# Altium PCB Grant..PcbDoc (part 3 of 5)
Units mil, origin at the board's own origin, x right, y up, seen from the top; angles counter-clockwise.
Board outline 2981 x 2481 mil, 2 copper layers (Top Layer, Bottom Layer), stack 57 mil thick; 181 components, 108 nets, 631 pads, 224 vias.
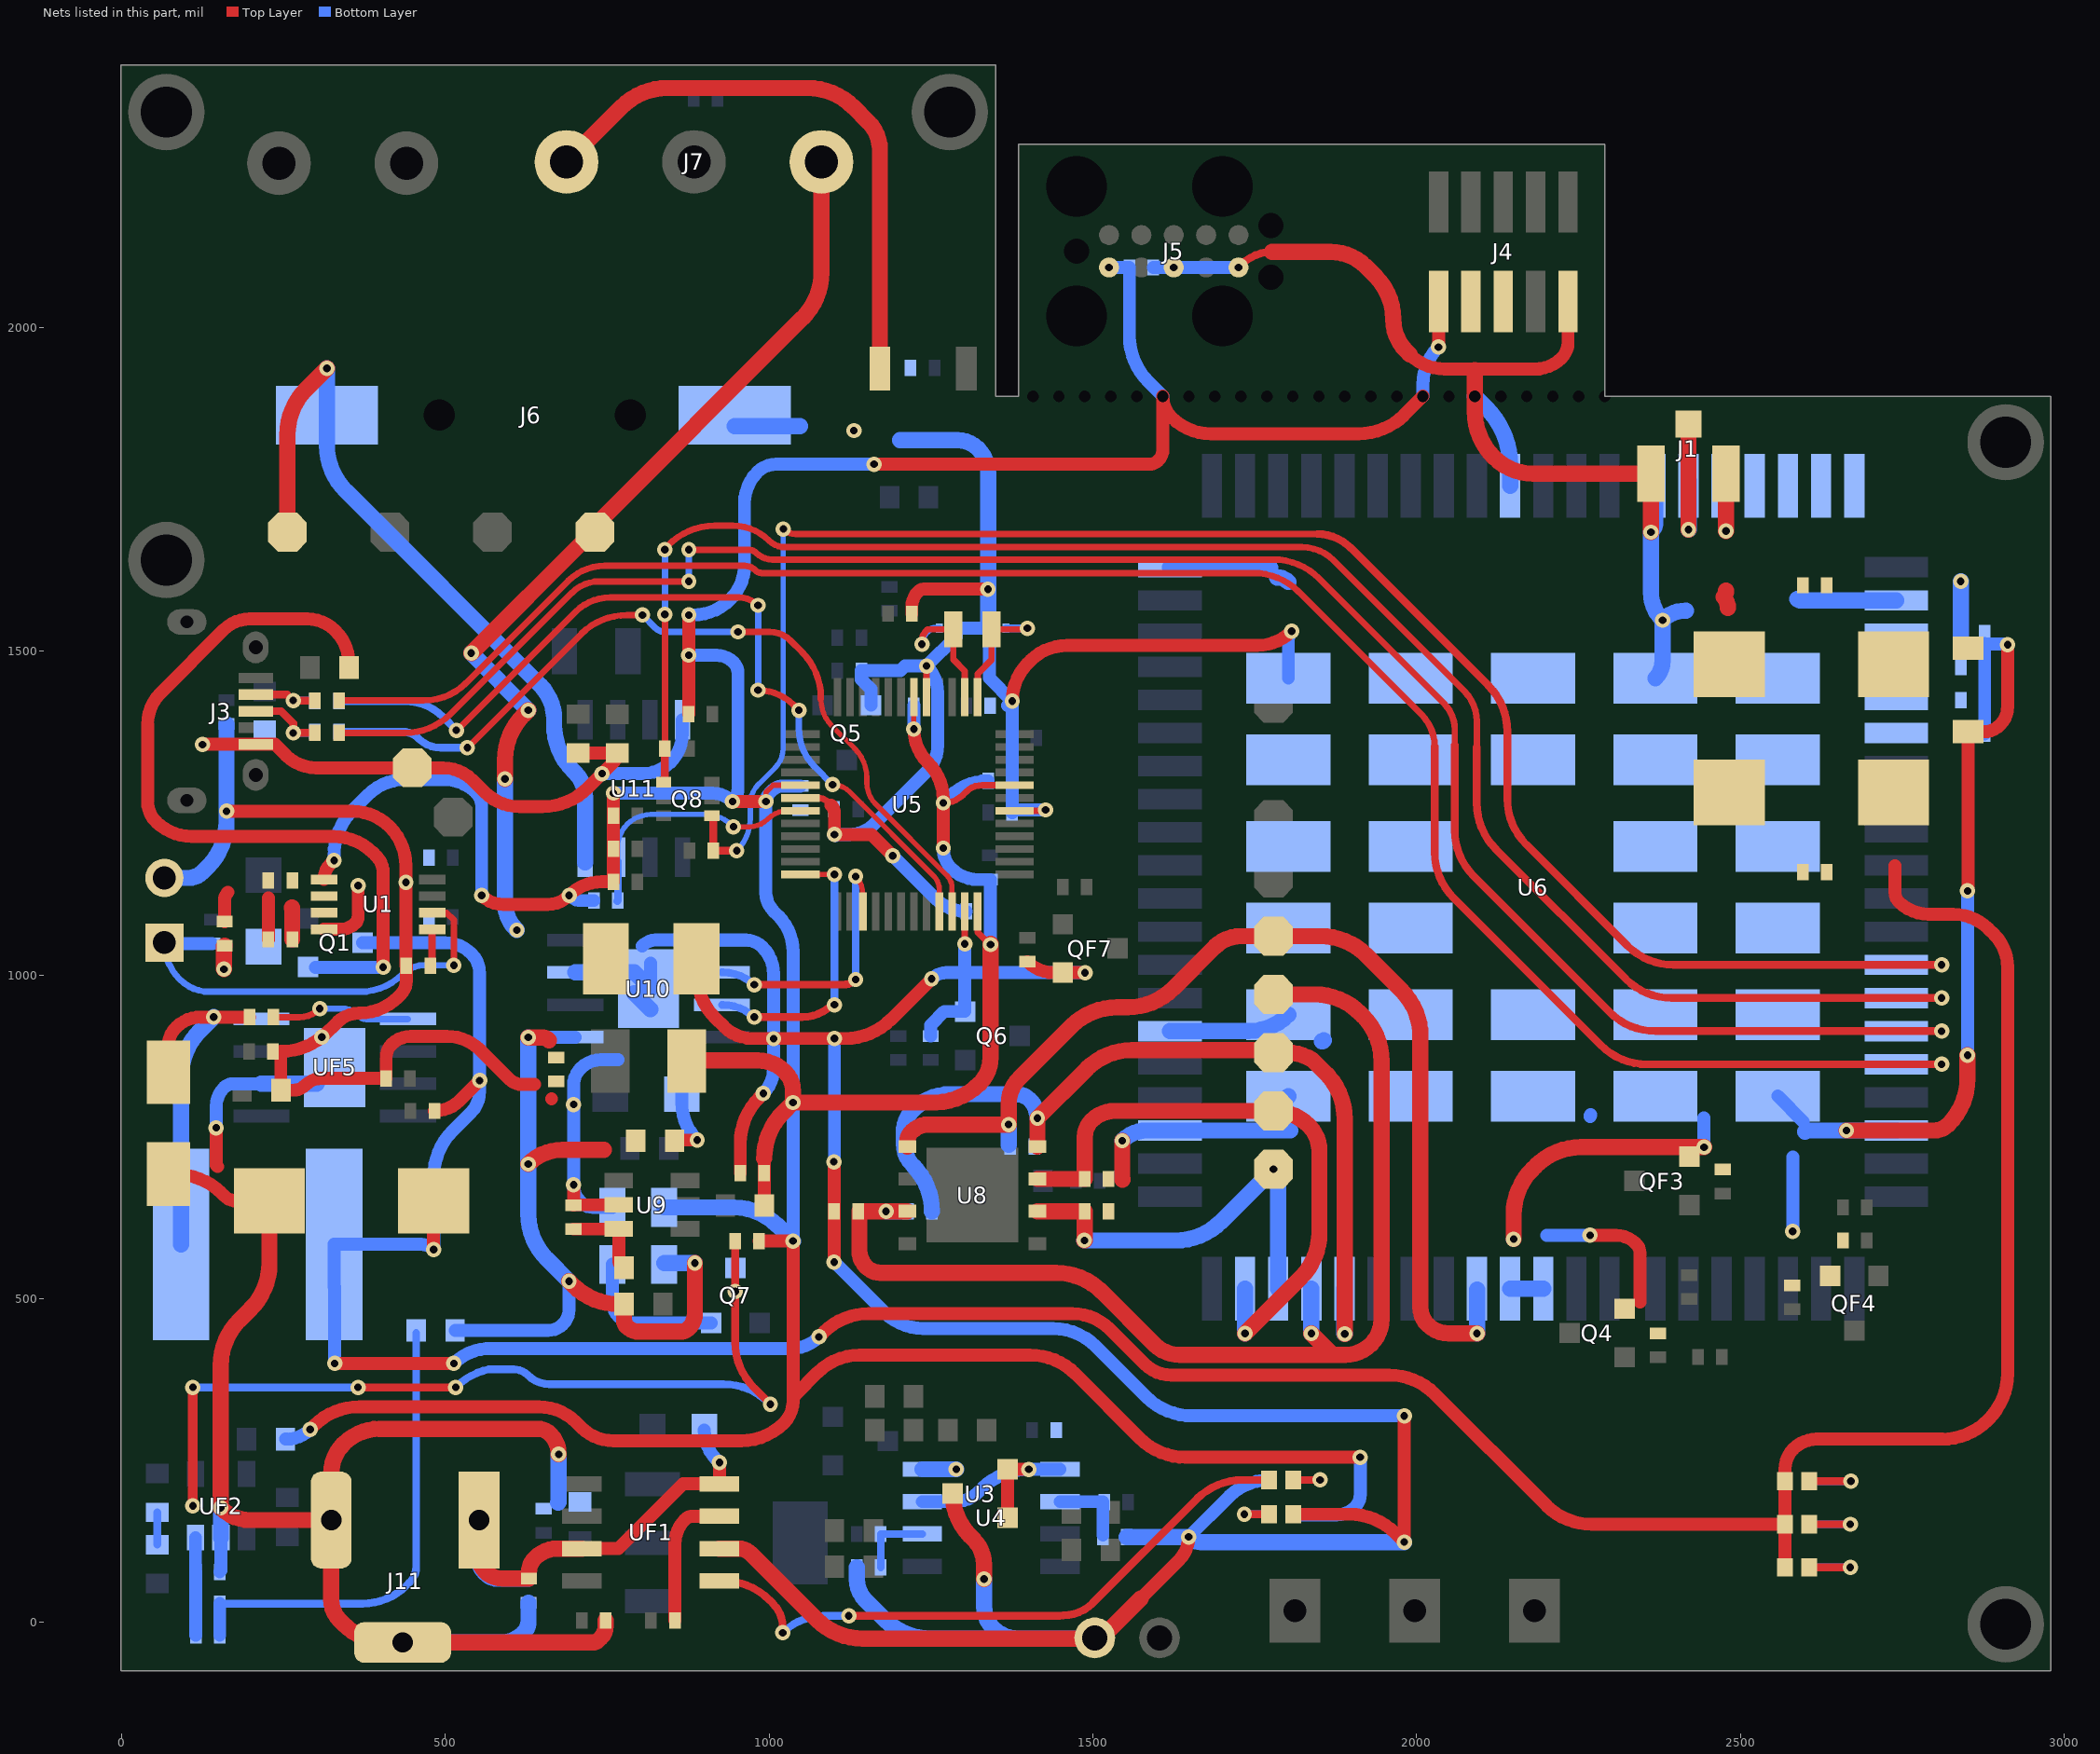
[diagram p2: the nets of this part, all layers, seen from the top]

## Part data (continued)
RP3: library part AC0402FR-0762KL, "RES SMD 62K OHM 1% 1/16W 0402", Case/Package=0402, Manufacturer=Yageo, Max Operating Temperature=155°C, Max Power Dissipation=63mW, Min Operating Temperature=-55°C, Resistance=62kR, Supplier Part Number 1=AC0402FR-0762KL-ND, Temperature Coefficient=100ppm/°C, Tolerance=1%, ComponentLink1Description=http://www.yageo.com/documents/recent/PYu-AC_51_RoHS_L_2_revised.pdf?src-supplier=Future+Electronics, ComponentLink1URL=http://www.yageo.com/documents/recent/PYu-AC_51_RoHS_L_2_revised.pdf?src-supplier=Future+Electronics, ComponentLink2Description=http://www.yageo.com/NewPortal/yageodocoutput?fileName=/pdf/R-Chip/PYu-AC_51_RoHS_L_6.pdf&src-supplier=Digi-Key, ComponentLink2URL=http://www.yageo.com/NewPortal/yageodocoutput?fileName=/pdf/R-Chip/PYu-AC_51_RoHS_L_6.pdf&src-supplier=Digi-Key, Composition="Thick Film", Features="Moisture Resistant,Automotive AEC-Q200", Height=0.015inch, Lead Free="Lead Free", Length=0.039inch, Manufacturer Part Number=AC0402FR-0762KL, Number of Terminations=2, Packaging="Tape and Reel", Power Rating=63mW, Pricing 1="10000=0.0022 (USD)", Stock 1=0, Supplier 1=Digi-Key, Width=0.02inch
RP4: library part RTT024022FTH, "40.2K ±1% 1/16W ±100ppm/°C 0402 Chip Resistor - Surface Mount RoHS", Manufacturer=RALEC, Package=0402, Manufacturer Part No=RTT024022FTH
S1: "SPDT 3A 250V On-On DIP Toggle Switches RoHS", Manufacturer="XKB Enterprise", Package=Custom, Manufacturer Part No=SS-12D06L5
SB1 SB2 SB4 SB5 SB6 SB7 SB8 SB9 SB10 SB11 SB12 SB13 SB14 SB15 SB16 SB17 SB18 SB19 SB20: "Solder Bridge ON"
SW1: "SWITCH TACTILE SPST-NO 0.05A 12V", Contact Current Rating=50mA, Contact Resistance=100mR, Insulation Resistance=100MR, Manufacturer=Omron, Max Operating Temperature=70°C, Max Voltage Rating (DC)=12V, Min Operating Temperature=-25°C, Operating Force=1.5N, Package Quantity=1, Ratings="Dust Proof,IP40", Supplier Part Number 1=SW1020DKR-ND, Actuator Length=0.4mm, Actuator Type=Standard, ComponentLink1Description=http://www.farnell.com/datasheets/60838.pdf?src-supplier=Farnell, ComponentLink1URL=http://www.farnell.com/datasheets/60838.pdf?src-supplier=Farnell, ComponentLink2Description=http://www.farnell.com/datasheets/60838.pdf?src-supplier=Element14, ComponentLink2URL=http://www.farnell.com/datasheets/60838.pdf?src-supplier=Element14, ComponentLink3Description=https://omronfs.omron.com/en_US/ecb/products/pdf/en-b3u.pdf?src-supplier=Digi-Key, ComponentLink3URL=https://omronfs.omron.com/en_US/ecb/products/pdf/en-b3u.pdf?src-supplier=Digi-Key, ComponentLink4Description=http://www.omron.com/ecb/products/pdf/en-b3u.pdf?src-supplier=Digi-Key, ComponentLink4URL=http://www.omron.com/ecb/products/pdf/en-b3u.pdf?src-supplier=Digi-Key, ComponentLink5Description=https://www.distrelec.biz/Web/Downloads/he/et/B3U_eng_datasheet.pdf?mime=application%2Fpdf&src-supplier=Distrelec, ComponentLink5URL=https://www.distrelec.biz/Web/Downloads/he/et/B3U_eng_datasheet.pdf?mime=application%2Fpdf&src-supplier=Distrelec, ComponentLink6Description=http://www.onlinecomponents.com/productFiles/mf-OM/en-b3u.pdf?src-supplier=Onlinecomponents.com, ComponentLink6URL=http://www.onlinecomponents.com/productFiles/mf-OM/en-b3u.pdf?src-supplier=Onlinecomponents.com, ComponentLink7Description=https://www.verical.com/server-webapp/html/getDatasheet?partID=552554&src-supplier=Verical, ComponentLink7URL=https://www.verical.com/server-webapp/html/getDatasheet?partID=552554&src-supplier=Verical, ComponentLink8Description=http://www.farnell.com/datasheets/1685550.pdf?src-supplier=Element14, ComponentLink8URL=http://www.farnell.com/datasheets/1685550.pdf?src-supplier=Element14, ComponentLink9Description=http://www.farnell.com/datasheets/2610940.pdf?src-supplier=Farnell, ComponentLink9URL=http://www.farnell.com/datasheets/2610940.pdf?src-supplier=Farnell, ComponentLink10Description=https://www.alliedelec.com/m/d/4c8a9ef82804fc3c241a13c1e298fd73.pdf?src-supplier=Allied+Electronics, ComponentLink10URL=https://www.alliedelec.com/m/d/4c8a9ef82804fc3c241a13c1e298fd73.pdf?src-supplier=Allied+Electronics, Contact Material=Silver, Current Rating=50mA, Depth=2.5mm, Electrical Life=200000Cycles, Height=1.2mm, Illumination Type=Non-Illuminated,Illuminated, Lead Free="Lead Free", Length=4mm, Manufacturer Part Number=B3U-1000P, Max Current Rating=50mA, Mechanical Life=200000Cycles, Mount="Surface Mount", Orientation=Straight, Packaging="Tape and Reel", Pricing 1="1=1, 10=0.961, 25=0.9064, 50=0.7976, 100=0.7251, 250=0.68888, 500=0.67074, 1000=0.52571 (USD)", REACH SVHC=Unknown, Stock 1=116454, Supplier 1=Digi-Key, Switch Function=Off-Mom, Switch Travel=0.15mm, Termination=SMD/SMT, Throw Configuration=SPST, Voltage Rating (DC)=12V, Weight=0.000776oz, Width=3mm
U1: "IC REG LINEAR 3.3V 500MA MICRO8", Case/Package=MSOP, Dropout Voltage=340mV, Manufacturer="ON Semiconductor", Max Input Voltage=16V, Max Operating Temperature=150°C, Max Output Current=800mA, Min Input Voltage=2.6V, Min Operating Temperature=-40°C, Min Output Voltage=3.3V, Output Voltage Accuracy=0.9%, Package Quantity=4000, Reference Voltage=1.269V, Supplier Part Number 1=NCP3335ADM330R2GOSCT-ND, Accuracy=0.9%, ComponentLink1Description=http://www.onsemi.com/pub_link/Collateral/NCP3335A-D.PDF?src-supplier=Future+Electronics, ComponentLink1URL=http://www.onsemi.com/pub_link/Collateral/NCP3335A-D.PDF?src-supplier=Future+Electronics, ComponentLink2Description=http://www.onsemi.com/pub/Collateral/NCP3335A-D.PDF?src-supplier=Digi-Key, ComponentLink2URL=http://www.onsemi.com/pub/Collateral/NCP3335A-D.PDF?src-supplier=Digi-Key, Halogen Free="Halogen Free", Height=0.95mm, Lead Free="Lead Free", Length=3.1mm, Manufacturer Part Number=NCP3335ADM330R2G, Mount="Surface Mount", Number of Outputs=1, Number of Pins=8, Number of Regulators=1, Output Current=800mA, Output Type=Fixed, Output Voltage=3.3V, Packaging="Tape and Reel", Polarity=Positive, Pricing 1="1=1.12, 10=1.003, 25=0.952, 100=0.731, 250=0.646, 500=0.612, 1000=0.476 (USD)", Radiation Hardening=No, Stock 1=2299, Supplier 1=Digi-Key, Width=3.1mm
U3: "IC VREF SHUNT 18V 0.5% SOT23", Case/Package=SOT-23, Cathode Current=100uA, Manufacturer="Diodes Zetex", Max Input Voltage=20V, Max Operating Temperature=125°C, Max Output Current=15mA, Max Output Voltage=18V, Min Operating Temperature=-40°C, Min Output Voltage=1.24V, Package Quantity=1, Supplier Part Number 1=TLV431BFCT-ND, Tolerance=0.5%, ComponentLink1Description=https://www.diodes.com/assets/Datasheets/TLV431.pdf?src-supplier=Digi-Key, ComponentLink1URL=https://www.diodes.com/assets/Datasheets/TLV431.pdf?src-supplier=Digi-Key, ComponentLink2Description=http://www.farnell.com/datasheets/1904413.pdf?src-supplier=Element14, ComponentLink2URL=http://www.farnell.com/datasheets/1904413.pdf?src-supplier=Element14, ComponentLink3Description=http://www.farnell.com/datasheets/2100168.pdf?src-supplier=Element14, ComponentLink3URL=http://www.farnell.com/datasheets/2100168.pdf?src-supplier=Element14, ComponentLink4Description=http://www.diodes.com/datasheets/TLV431.pdf?src-supplier=Future+Electronics, ComponentLink4URL=http://www.diodes.com/datasheets/TLV431.pdf?src-supplier=Future+Electronics, Height=1.02mm, Lead Free="Lead Free", Length=3.04mm, Manufacturer Part Number=TLV431BFTA, Mount="Surface Mount", Number of Pins=3, Output Current=15mA, Output Type=Adjustable, Output Voltage=18V, Packaging="Tape and Reel", Pricing 1="1=0.49, 10=0.417, 25=0.3888, 100=0.2889, 250=0.24444, 500=0.23332, 1000=0.17221 (USD)", Radiation Hardening=No, REACH SVHC="No SVHC", Reference Type=Shunt,Adjustable, Reference Voltage=18V, Stock 1=51651, Supplier 1=Digi-Key, Width=1.4mm
U4: "IC COMPARATOR LP DUAL 8-SOIC", Case/Package=SO, Dual Supply Voltage=9V, Input Bias Current=250nA, Input Offset Voltage (Vos)=5mV, Manufacturer=STMicroelectronics, Max Dual Supply Voltage=18V, Max Operating Temperature=70°C, Max Power Dissipation=710mW, Max Supply Current=1mA, Max Supply Voltage=36V, Min Dual Supply Voltage=1V, Min Operating Temperature=0°C, Min Supply Voltage=2V, Natural Thermal Resistance=125°C/W, Operating Supply Voltage=28V, Output Current=18mA, Output Current per Channel=100pA, Package Quantity=2500, Quiescent Current=2.5mA, Supplier Part Number 1=497-1593-1-ND, Voltage Gain=106.02dB, ComponentLink1Description=http://www.st.com/content/ccc/resource/technical/document/datasheet/group1/b4/cc/cf/13/18/28/44/f5/CD00000465/files/CD00000465.pdf/jcr:content/translations/en.CD00000465.pdf?src-supplier=Digi-Key, ComponentLink1URL=http://www.st.com/content/ccc/resource/technical/document/datasheet/group1/b4/cc/cf/13/18/28/44/f5/CD00000465/files/CD00000465.pdf/jcr:content/translations/en.CD00000465.pdf?src-supplier=Digi-Key, ComponentLink2Description=https://www.verical.com/server-webapp/html/getDatasheet?partID=302604&src-supplier=Verical, ComponentLink2URL=https://www.verical.com/server-webapp/html/getDatasheet?partID=302604&src-supplier=Verical, ComponentLink3Description=http://www.st.com/st-web-ui/static/active/en/resource/technical/document/datasheet/CD00000465.pdf?src-supplier=Avnet, ComponentLink3URL=http://www.st.com/st-web-ui/static/active/en/resource/technical/document/datasheet/CD00000465.pdf?src-supplier=Avnet, ComponentLink4Description=http://www.mouser.com/ds/2/389/lm193-955038.pdf?src-supplier=Mouser, ComponentLink4URL=http://www.mouser.com/ds/2/389/lm193-955038.pdf?src-supplier=Mouser, ComponentLink5Description=http://www.farnell.com/datasheets/2291162.pdf?src-supplier=Element14, ComponentLink5URL=http://www.farnell.com/datasheets/2291162.pdf?src-supplier=Element14, ComponentLink6Description=https://www.distrelec.biz/Web/Downloads/_e/ng/LM393_ST_tds_eng.pdf?mime=application%2Fpdf&src-supplier=Distrelec, ComponentLink6URL=https://www.distrelec.biz/Web/Downloads/_e/ng/LM393_ST_tds_eng.pdf?mime=application%2Fpdf&src-supplier=Distrelec, ComponentLink7Description=http://www.st.com/web/en/resource/technical/document/datasheet/CD00000465.pdf?src-supplier=Future+Electronics, ComponentLink7URL=http://www.st.com/web/en/resource/technical/document/datasheet/CD00000465.pdf?src-supplier=Future+Electronics, ComponentLink8Description=http://datasheet.iiic.cc/stmicroelectronics/LM393DT.pdf?src-supplier=IIIC, ComponentLink8URL=http://datasheet.iiic.cc/stmicroelectronics/LM393DT.pdf?src-supplier=IIIC, Contact Plating=Gold, Height=1.25mm, Lead Free="Lead Free", Length=4.9mm, Manufacturer Part Number=LM393DT, Max Input Current=250nA, Mount="Surface Mount", Nominal Supply Current=1mA, Number of Channels=2, Number of Elements=2, Number of Pins=8, Output Type=TTL, Packaging="Tape and Reel", Pricing 1="1=0.48, 10=0.358, 25=0.3136, 100=0.1792, 250=0.168, 500=0.1344, 1000=0.10304 (USD)", Propagation Delay=1.3us, Radiation Hardening=No, REACH SVHC="No SVHC", Response Time=1.3us, Stock 1=46251, Supplier 1=Digi-Key, Turn-On Delay Time=1.3us, Type="General Purpose", Weight=0.01lb, Width=3.9mm
U5: "IC MCU 32BIT 256KB FLASH 48TQFP", Manufacturer=Microchip, Manufacturer Part Number=ATSAMD21G18A-AUT, Supplier Part Number 1=ATSAMD21G18A-AUTDKR-ND, ComponentLink1Description=http://www.microchip.com/mymicrochip/filehandler.aspx?ddocname=en590210, ComponentLink1URL=http://www.microchip.com/mymicrochip/filehandler.aspx?ddocname=en590210, Pricing 1="1=3.32, 25=3.0104, 100=2.7348 (USD)", Stock 1=4547, Supplier 1=Digi-Key
U6: "UMTS/HSPA+ Module", Manufacturer=Quectel, Package=Custom, Manufacturer Part No=UC200T
U8: "GLOBAL IOT EMBEDDED SIM CHIP", Manufacturer=Hologram, Supplier Part Number 1=1887-1002-1-ND, ComponentLink1Description=https://media.digikey.com/pdf/Data%20Sheets/Hologram%20PDFs/SIM_DS_170107_v2.pdf?src-supplier=Digi-Key, ComponentLink1URL=https://media.digikey.com/pdf/Data%20Sheets/Hologram%20PDFs/SIM_DS_170107_v2.pdf?src-supplier=Digi-Key, Manufacturer Part Number=SIM-ST-MFF2, Pricing 1="1=6.3, 100=5.985 (USD)", Stock 1=0, Supplier 1=Digi-Key
U9: "Step-Up Positive Adjustable 1 2A 1.2MHz SOT-23-6 DC-DC Converters RoHS", Manufacturer="Axelite Tech", Package=SOT-23-6, Manufacturer Part No=AX5523CA
U10: "IC MOTOR DRVR UNIPLR 8SO PWRPAD", Manufacturer="Texas Instruments", Max Operating Temperature=125°C, Max Output Current=3.6A, Min Operating Temperature=-40°C, Supplier Part Number 1=296-43024-1-ND, ComponentLink1Description=http://www.ti.com/lit/pdf/slyb165?src-supplier=Digi-Key, ComponentLink1URL=http://www.ti.com/lit/pdf/slyb165?src-supplier=Digi-Key, ComponentLink2Description=http://www.ti.com/lit/ds/symlink/drv8871.pdf?src-supplier=Digi-Key, ComponentLink2URL=http://www.ti.com/lit/ds/symlink/drv8871.pdf?src-supplier=Digi-Key, Fault Protection="Over Temperature", Interface=PWM, Lead Free="Lead Free", Manufacturer Part Number=DRV8871DDAR, Mount="Surface Mount", Packaging="Tape and Reel", Pricing 1="1=2.51, 10=2.253, 25=2.1252, 100=1.7, 250=1.48752, 500=1.445, 1000=1.1475 (USD)", Stock 1=8562, Supplier 1=Digi-Key
U11: "IC RTC CLK/CALENDAR I2C 8-SOIC", Case/Package=SOIC, Manufacturer=Microchip, Max Operating Temperature=85°C, Max Supply Voltage=5.5V, Min Operating Temperature=-40°C, Min Supply Voltage=1.8V, Package Quantity=3300, Supplier Part Number 1=MCP7940MT-I/SNCT-ND, ComponentLink1Description=http://ww1.microchip.com/downloads/en/DeviceDoc/25010A.pdf?src-supplier=Avnet, ComponentLink1URL=http://ww1.microchip.com/downloads/en/DeviceDoc/25010A.pdf?src-supplier=Avnet, Date Format=YY-MM-DD-dd, Interface=I2C,Serial,2-Wire, Logic Function=Clock, Manufacturer Part Number=MCP7940MT-I/SN, Memory Size=64B, Mount="Surface Mount", Number of Pins=8, Packaging="Tape and Reel", Pricing 1="1=0.58, 25=0.54, 100=0.5125 (USD)", Radiation Hardening=No, Stock 1=2867, Supplier 1=Digi-Key, Time Format=HH:MM:SS
UF1: "IC LI-ION LDO CHARGE MGMT 8SOIC", Battery Pack Voltage=8.4V, Case/Package=D, Manufacturer="Texas Instruments", Max Operating Temperature=70°C, Max Supply Voltage=15V, Min Input Voltage=4.5V, Min Operating Temperature=-20°C, Output Current=2A, Package Quantity=2500, Supplier Part Number 1=296-41202-1-ND, ComponentLink1Description=http://www.ti.com/lit/ds/symlink/bq2057c.pdf?src-supplier=Digi-Key, ComponentLink1URL=http://www.ti.com/lit/ds/symlink/bq2057c.pdf?src-supplier=Digi-Key, ComponentLink2Description=http://focus.ti.com/lit/ds/symlink/bq2057.pdf?src-supplier=Avnet+Europe, ComponentLink2URL=http://focus.ti.com/lit/ds/symlink/bq2057.pdf?src-supplier=Avnet+Europe, ComponentLink3Description=http://www.ti.com/general/docs/lit/getliterature.tsp?genericPartNumber=BQ2057W&&fileType=pdf&src-supplier=Avnet, ComponentLink3URL=http://www.ti.com/general/docs/lit/getliterature.tsp?genericPartNumber=BQ2057W&&fileType=pdf&src-supplier=Avnet, ComponentLink4Description=https://www.verical.com/server-webapp/html/getDatasheet?partID=613088&src-supplier=Verical, ComponentLink4URL=https://www.verical.com/server-webapp/html/getDatasheet?partID=613088&src-supplier=Verical, ComponentLink5Description=http://datasheet.iiic.cc/texas_instruments/BQ2057WSNTR.pdf?src-supplier=IIIC, ComponentLink5URL=http://datasheet.iiic.cc/texas_instruments/BQ2057WSNTR.pdf?src-supplier=IIIC, Contact Plating=Gold, Lead Free="Lead Free", Manufacturer Part Number=BQ2057WSNTR, Min Supply Voltage=4.5V, Number of Cells=2, Number of Pins=8, Output Voltage=8.4V, Packaging="Tape and Reel", Pricing 1="1=2.01, 10=1.802, 25=1.7, 100=1.36, 250=1.19, 500=1.156, 1000=0.918 (USD)", Radiation Hardening=No, Stock 1=9023, Supplier 1=Digi-Key, Weight=0.002677oz
UF2: "IC REG BOOST ADJ 2A SOT23-5", Case/Package=SOT-23-5, Manufacturer="TI National Semiconductor", Max Input Voltage=14V, Max Operating Temperature=125°C, Max Output Current=1.4A, Max Output Voltage=20V, Min Input Voltage=2.7V, Min Operating Temperature=-40°C, Min Output Voltage=3V, Package Quantity=1000, Quiescent Current=2mA, Supplier Part Number 1=LMR62014XMF/NOPBCT-ND, Switching Frequency=1.6MHz, ComponentLink1Description=http://www.ti.com/general/docs/lit/getliterature.tsp?genericPartNumber=LMR62014&&fileType=pdf&src-supplier=Avnet, ComponentLink1URL=http://www.ti.com/general/docs/lit/getliterature.tsp?genericPartNumber=LMR62014&&fileType=pdf&src-supplier=Avnet, ComponentLink2Description=http://www.ti.com/lit/gpn/lmr62014?src-supplier=Mouser, ComponentLink2URL=http://www.ti.com/lit/gpn/lmr62014?src-supplier=Mouser, ComponentLink3Description=http://www.farnell.com/datasheets/1882593.pdf?src-supplier=Element14, ComponentLink3URL=http://www.farnell.com/datasheets/1882593.pdf?src-supplier=Element14, ComponentLink4Description=http://www.ti.com/lit/ds/symlink/lmr62014.pdf?src-supplier=Digi-Key, ComponentLink4URL=http://www.ti.com/lit/ds/symlink/lmr62014.pdf?src-supplier=Digi-Key, Contact Plating=Tin,Matte, Lead Free="Lead Free", Manufacturer Part Number=LMR62014XMF/NOPB, Mount="Surface Mount", Number of Outputs=1, Number of Pins=5, Output Configuration=Positive, Output Current=1.4A, Output Type=Adjustable, Output Voltage=20V, Packaging="Tape and Reel", Pricing 1="1=1.6, 10=1.428, 25=1.3552, 100=1.0406, 250=0.9196, 500=0.8712 (USD)", Radiation Hardening=No, REACH SVHC="No SVHC", Stock 1=74950, Supplier 1=Digi-Key, Synchronous Rectifier=No, Topology=Boost
UF5: "IC REG BUCK ADJUSTABLE 3A 8SOPWR", Manufacturer="Texas Instruments", Max Input Voltage=36V, Max Operating Temperature=125°C, Max Output Current=3A, Max Output Voltage=31V, Min Input Voltage=5.5V, Min Operating Temperature=-40°C, Min Output Voltage=1.22V, Package Quantity=2500, Quiescent Current=3mA, Supplier Part Number 1=296-23177-1-ND, Switching Frequency=500kHz, ComponentLink1Description=http://www.ti.com/general/docs/lit/getliterature.tsp?genericPartNumber=TPS5430-Q1&&fileType=pdf&src-supplier=Avnet, ComponentLink1URL=http://www.ti.com/general/docs/lit/getliterature.tsp?genericPartNumber=TPS5430-Q1&&fileType=pdf&src-supplier=Avnet, ComponentLink2Description=http://focus.ti.com/lit/ds/symlink/tps5430-q1.pdf?src-supplier=Avnet+Europe, ComponentLink2URL=http://focus.ti.com/lit/ds/symlink/tps5430-q1.pdf?src-supplier=Avnet+Europe, ComponentLink3Description=http://www.ti.com/lit/ds/symlink/tps5430-q1.pdf?src-supplier=Digi-Key, ComponentLink3URL=http://www.ti.com/lit/ds/symlink/tps5430-q1.pdf?src-supplier=Digi-Key, ComponentLink4Description=http://www.farnell.com/datasheets/2019094.pdf?src-supplier=Element14, ComponentLink4URL=http://www.farnell.com/datasheets/2019094.pdf?src-supplier=Element14, ComponentLink5Description=http://www.ti.com/lit/gpn/tps5430-q1?src-supplier=Mouser, ComponentLink5URL=http://www.ti.com/lit/gpn/tps5430-q1?src-supplier=Mouser, ComponentLink6Description=http://datasheet.iiic.cc/texas_instruments/TPS5430QDDARQ1.pdf?src-supplier=IIIC, ComponentLink6URL=http://datasheet.iiic.cc/texas_instruments/TPS5430QDDARQ1.pdf?src-supplier=IIIC, Efficiency=95%, Lead Free="Lead Free", Manufacturer Part Number=TPS5430QDDARQ1, Mount="Surface Mount", Number of Outputs=1, Number of Pins=8, Operating Supply Voltage=36V, Output Current=3A, Output Type=Adjustable, Output Voltage=31V, Packaging="Tape and Reel", Pricing 1="1=4.81, 10=4.32, 25=4.0836, 100=3.3578, 250=3.01292, 500=2.904, 1000=2.41395 (USD)", Radiation Hardening=No, REACH SVHC="No SVHC", Stock 1=2547, Supplier 1=Digi-Key, Synchronous Rectifier=No, Weight=0.00249oz
X1: "32.768KHz ±20ppm 9pF 90kO SMD-2012_2P SMD Crystal Resonators RoHS", Manufacturer=Seiko, Manufacturer Part No=SC-20S,32.768kHz,20PPM,9pF, Pakage=Custom
X3: "CRYSTAL 32.7680KHZ 12.5PF SMD", Case/Package=SMD/SMT, ESR (Equivalent Series Resistance)=70kR, Frequency=32.768kHz, Frequency Tolerance=20ppm, Load Capacitance=12.5pF, Manufacturer=NDK, Max Operating Temperature=85°C, Min Operating Temperature=-40°C, Package Quantity=1000, Supplier Part Number 1=644-1156-6-ND, ComponentLink1Description=https://media.digikey.com/pdf/Data%20Sheets/NDK%20PDFs/NX3215SA-32.768K-STD-MUA-8.pdf?src-supplier=Digi-Key, ComponentLink1URL=https://media.digikey.com/pdf/Data%20Sheets/NDK%20PDFs/NX3215SA-32.768K-STD-MUA-8.pdf?src-supplier=Digi-Key, ComponentLink2Description=http://www.ndk.com/images/products/catalog/c_NX3215SA-STD-MUA-14_e.pdf?src-supplier=Digi-Key, ComponentLink2URL=http://www.ndk.com/images/products/catalog/c_NX3215SA-STD-MUA-14_e.pdf?src-supplier=Digi-Key, Height=0.035inch, Lead Free="Lead Free", Length=0.126inch, Manufacturer Part Number=NX3215SA-32.768K-STD-MUA-8, Mount="Surface Mount", Number of Pins=2, Packaging="Tape and Reel", Pricing 1="1=0.68, 10=0.602, 50=0.5628, 100=0.4974, 500=0.47124, 1000=0.3927 (USD)", Stock 1=29951, Supplier 1=Digi-Key, Width=0.059inch

## Free pads (board coordinates)
  round 118.11 hole 78.74: MH1(69,1641) MH2(69,2333) MH3(1279,2333) MH4(2910,1823) MH5(2910,-3)
  round 0 hole 17.72 mask+0: NC(1407.37,1894) NC(1608.16,1894) NC(1768.79,1894) NC(1849.1,1894) NC(2009.73,1894) NC(2090.05,1894)
  round 0 hole 17.72 unplated mask+0: NC(1447.53,1894) NC(1487.68,1894) NC(1527.84,1894) NC(1568,1894) NC(1648.32,1894) NC(1688.47,1894) NC(1728.63,1894) NC(1808.94,1894) NC(1889.26,1894) NC(1929.42,1894) NC(1969.57,1894) NC(2049.89,1894) NC(2130.2,1894) NC(2170.36,1894) NC(2210.52,1894) NC(2250.68,1894) NC(2290.83,1894)

## Via types
v1: diameter 23.62, hole 11.81, Top Layer to Bottom Layer, 224 vias

## Nets (pads, with @x,y where several pads share a name; then routed paths per layer and width w, separated by ;. In a path a pad name is that pad's centre, name@x,y a point inside that pad or via, vN(x,y) a via of type N, cw(c..) or ccw(c..) an arc to the next point about the centre after c; other vN are vias at no path point)
3V3: C3.1 C4.1 C11.1 C12.1 C13.1 C14.1 C29.1 C36.1 C40.1 J4.1 J5.1 L1.1 pad.NC@1608.16,1894 pad.NC@2009.73,1894 R1.2 R9.2 R23.2 R24.2 R25.2 RB1.2 RS2.1 RS4.1 SB5.1 SB6.1 U1.1 U1.2 U1.3 U5.6 U5.17 U5.36 U5.44 | length 8433.2
  Top Layer w8: v1(995,1268) 995,1282 1006.17,1293.17 U5.17@1048.38,1293.17 ; v1(1223.57,1380) U5.6@1223.57,1429
  Top Layer w10: v1(1269,1265.81) ccw(c1269,1309.6) 1299.94,1278.62 ; 1299.96,1278.64 1304.2,1282.88 cw(c1329.06,1258.02) 1329.06,1293.17 U5.44@1379.09,1293.17 ; U5.36@1322,1098.29 1322,1066 1340,1048 v1@1342,1048
  Top Layer w20: v1(291,298) 296.71,303.71 cw(c367.42,233) 367.42,333 644,333 cw(c644,250.92) 702.04,308.96 710,301 ccw(c759.68,350.68) 759.68,280.42 956.42,280.42 ccw(c956.42,374.58) 1023,308 ccw(c989.2,341.8) 1037,341.8 ; U1.1@312.54,1147.39 cw(c346.43,1147.39) 322.46,1171.36 v1(328,1176.89) ; v1(556,1123) ccw(c589.8,1156.8) 589.8,1109 657.36,1109 ccw(c657.36,1156.8) v1(691.16,1123) cw(c741.86,1072.3) 741.86,1144 R24.2@759.5,1144 R23.2@759.5,1194.75 RS2.1@759.5,1246 v1(759.5,1281) ; RS4.1@876,1403.5 v1(876,1556) ; v1(943.46,1268) v1@992,1268 ; RB1.2@984.5,589 v1(1037,589) 1037,341.8 ; SB5.1@992.5,644 C36.1@992.5,694 992.5,717.08 ; v1(1162,1789) 1587.18,1789 ccw(c1587.18,1808.65) 1601.08,1794.76 ccw(c1583.98,1811.85) 1606.92,1804.21 ccw(c1583.98,1811.85) 1608.16,1811.85 pad.NC@1608.16,1894 ccw(c1654.41,1894) 1621.7,1861.3 ccw(c1682.77,1922.37) 1682.77,1836 1910.31,1836 ccw(c1910.31,1936) 1981.02,1865.29 pad.NC@2009.73,1894 ; v1(1223.57,1380) ccw(c1296.23,1380) 1244.82,1328.66 ; 1244.85,1328.63 1245.72,1327.76 cw(c1189.51,1271.55) 1269,1271.55 v1(1269,1265.81) v1@1269,1196.81 ; v1(1913,255) 1643.42,255 cw(c1643.42,355) 1572.71,284.29 1473.29,383.71 ccw(c1402.58,313) 1402.58,413 1140.18,413 ccw(c1140.18,320.82) 1075,386 1041.38,352.38 ccw(c1051.97,341.8) 1037,341.8 ; v1(2033.81,1970) 2034,1970.19 J4.1@2034,2040.46
  Top Layer w25: 263,1104 cw(c261.79,1102.79) 263.5,1102.79 C3.1@263.5,1055 ; L1.1@873,868 982.21,868 cw(c982.21,808.04) 1024.61,850.44 cw(c994.68,820.52) 1037,820.52 v1(1037,803) ; 992.5,717.08 cw(c1092.5,717.08) 1021.79,787.79 v1(1037,803) ; v1@1342,1048 v1(1342,1047) 1342,872.63 cw(c1284.95,872.63) 1325.29,832.29 cw(c1254.58,903) 1258.06,803.06 cw(c1254.58,903) 1254.58,803 v1(1037,803)
  Bottom Layer w20: SB6.1@253,283 254.79,283 ccw(c254.79,334.21) v1(291,298) ; v1(328,1176.89) 328,1184.58 cw(c428,1184.58) 357.29,1255.29 380,1278 cw(c437.94,1220.06) 437.94,1302 497.3,1302 cw(c497.3,1230.3) 548,1281 cw(c528.69,1261.69) 556,1261.69 v1(556,1123) ; v1(691.16,1123) ccw(c710.48,1142.31) 710.48,1115 R25.2@729.5,1115 ; v1(759.5,1281) 912.07,1281 cw(c912.07,1236.62) v1(943.46,1268) ccw(c922.83,1288.62) 952,1288.62 952,1466.1 ccw(c928.1,1466.1) 945,1483 ccw(c918.44,1456.44) 918.44,1494 v1(875.81,1494) ; v1(876,1556) 882.06,1556 ccw(c882.06,1637.94) 940,1580 ccw(c886.89,1633.11) 962,1633.11 962,1728.72 cw(c1030.28,1728.72) 982,1777 cw(c1010.97,1748.03) 1010.97,1789 v1(1162,1789) ; v1(1037,589) v1@1037,802 ; v1(1037,803) 1037,1036 ccw(c957.95,1036) 1013.85,1091.9 1006.61,1099.14 cw(c1035,1127.32) 995,1127.32 v1(995,1268) cw(c1011.9,1268) 999.94,1279.94 1005,1285 cw(c1021.87,1268.13) 1021.87,1291.99 C12.1@1048.38,1291.99 ; C11.1@1223.5,1416 1223.5,1380.07 v1(1223.57,1380) ; v1(1269,1196) 1269,1194.68 ccw(c1311.68,1194.68) 1281.5,1164.5 ; v1(1269,1265.81) 1278.22,1275.03 cw(c1338.5,1214.75) 1285.61,1281.61 cw(c1338.5,1214.75) C13.1@1338.5,1300 ; 1281.53,1164.47 ccw(c1322.54,1205.54) 1322.54,1147.5 R9.2@1341,1147.5 1341.5,1147 C14.1@1341.5,1098.29 1341.5,1048.5 v1@1342,1048 ; v1(1525,2093) C29.1@1556.62,2093 1556.62,1986.96 ccw(c1656.62,1986.96) 1585.91,1916.25 pad.NC@1608.16,1894 ; R1.2@1808.5,166 1876.03,166 ccw(c1876.03,206.97) 1905,178 ccw(c1885.69,197.31) 1913,197.31 v1(1913,255) ; pad.NC@2009.73,1894 2009.73,1911.87 cw(c2091.94,1911.87) v1(2033.81,1970)
  Bottom Layer w25: C40.1@838,641 945.58,641 cw(c945.58,545.83) 1012.88,613.12 v1(1037,589)
3V8: C19.1 C20.1 C21.1 C22.1 C23.1 C24.1 C25.1 C26.1 CF3.1 D2.2 L2.2 LED3.1 LED4.1 LEDF1.1 Q1.3 RF5.1 U6.57 U6.58 U6.59 U6.60 | length 5119.8
  Top Layer w20: v1(329,400) v1(513,400) ; CF3.1@481.77,651 481.77,576.12 v1(482,575.89) ; RF5.1@483,790 ccw(c483,845.53) 522.26,806.26 v1(553,837) ; v1(1077,441) 1083.71,447.71 cw(c1154.42,377) 1154.42,477 1467.82,477 cw(c1467.82,394.47) 1526.17,452.83 1579.71,399.29 ccw(c1621.45,441.03) 1621.45,382 1957.58,382 cw(c1957.58,282) 2028.29,352.71 2200.21,180.79 ccw(c2270.92,251.5) 2270.92,151.5 LED4.1@2569.3,151.5 ; LED3.1@2569.3,85 LED4.1@2569.3,151.5 ; 2739,1169 2739,1127.49 ccw(c2759.49,1127.49) 2745,1113 ccw(c2790.87,1158.87) 2790.87,1094 2828.18,1094 cw(c2828.18,1015.47) 2883.71,1071 2891.99,1062.72 cw(c2841.27,1012) 2913,1012 2913,384.42 cw(c2813,384.42) 2883.71,313.71 2882.29,312.29 cw(c2811.58,383) 2811.58,283 2618.21,283 ccw(c2618.21,231.79) 2582,268 ccw(c2612.66,237.34) 2572.63,254 ccw(c2612.66,237.34) 2569.3,237.34 LEDF1.1@2569.3,218 LED4.1@2569.3,151.5
  Bottom Layer w20: v1(329,400) 329,517.89 328,518.89 328.11,519 L2.2@328.11,584 462.43,584 cw(c462.43,556.33) v1(482,575.89) 482,688.58 cw(c582,688.58) 511.29,759.29 539,787 ccw(c505.2,820.8) 553,820.8 v1(553,837) 553,1002.15 ccw(c509.36,1002.15) 540.22,1033.01 ccw(c499.22,992.01) 540.15,1033.08 ccw(c499.22,992.01) 499.22,1049.99 Q1.3@372.32,1049.99 ; v1(513,400) cw(c568.53,344.47) 563.86,422.86 cw(c568.53,344.47) 568.53,423 1033.54,423 ccw(c1033.54,484.46) v1(1077,441)
  Bottom Layer w25: 2840.5,1511.25 C21.1@2840.5,1528.25 v1(2840.5,1608)
12V: C37.1 C38.2 C39.1 J7.1 P16.1 SB11.2 SB12.2 SB13.2 U10.5 | length 2693
  Top Layer w25: v1(540,1497.15) P16.1@716.86,1674.01 ; v1(592,1303) 592,1331.58 cw(c692,1331.58) 621.29,1402.29 v1(628,1409) ; v1(628,708) cw(c681.11,654.89) 681.11,730 745,730 ; v1(628,903.66) 648.7,903.66 cw(c648.7,887.62) 660.04,898.96 ; v1(691,527) 697.21,520.79 ccw(c767.92,591.5) 767.92,491.5 SB13.2@776,491.5 776,466.66 ccw(c789.66,466.66) 780,457 ccw(c799.31,476.31) 799.31,449 863.14,449 ccw(c863.14,467.12) 875.96,454.31 ccw(c853.43,476.84) 885.29,476.84 v1(885.29,555) ; P16.1@721,1684 1051.56,2014.56 ccw(c980.85,2085.27) 1080.85,2085.27 J7.1@1080.85,2256
  Bottom Layer w20: SB12.2@515,451 657.86,451 ccw(c657.86,485.14) 682,461 ccw(c660.27,482.73) 691,482.73 v1(691,527) ; v1(628,903.66) 628.34,904 U10.5@700.62,904
  Bottom Layer w25: v1@539.92,1497.08 v1(628,1409) ; v1@591.79,1302.79 592,1302.57 592,1112.81 ccw(c652.54,1112.81) 609.73,1070 cw(c604.21,1064.47) v1(610.35,1069.31) ; v1(628,903.66) v1(628,708) 628,631.42 ccw(c728,631.42) 657.29,560.71 v1(691,527) ; C37.1@838,555 v1(885.29,555)
!RXD: Q8.1 RS1.2 U6.68 | length 2809.3
  Top Layer w10: RS1.2@839,1349.94 v1(839,1557) ; v1@839,1658.51 845.2,1664.71 cw(c915.91,1594) 866.27,1680.81 cw(c915.91,1594) 915.91,1694 944.47,1694 cw(c944.47,1615.47) 1000,1671 ccw(c1024.6,1695.6) 1024.6,1660.81 1823,1660.81 cw(c1823,1591.83) 1871.78,1640.61 2073.69,1438.69 ; 2073.72,1438.67 cw(c2027.08,1392.08) 2093,1392.08 2093,1352
  Top Layer w12: RS1.2@839,1349.94 839.1,1349.84 Q8.1@839.1,1297.53 ; 2093,1352 2093,1265.42 ccw(c2193,1265.42) 2122.29,1194.71 2323.24,993.76 ccw(c2393.95,1064.47) 2393.95,964.47 v1(2811,964.47)
  Bottom Layer w10: v1(839,1557) v1(839,1657) ; U6.68@2741,964.47 v1(2811,964.47)
!TXD: Q8.4 RS3.2 U6.67 | length 2892
  Top Layer w10: v1(1022,1689) ccw(c1040.86,1707.86) 1040.86,1681.19 1846.85,1681.19
  Top Layer w12: Q8.4@913.9,1245.35 913.9,1193.04 RS3.2@914,1192.94 ; RS3.2@914,1191.94 949.94,1191.94 v1(950,1192) ; 1846.85,1681.19 cw(c1846.85,1608.85) 1898,1660 2110.95,1447.05 cw(c2040.24,1376.34) 2140.24,1376.34 2140.24,1272.18 ccw(c2240.24,1272.18) 2169.53,1201.47 2326.06,1044.94 ccw(c2396.77,1115.65) 2396.77,1015.65 v1(2811,1015.65)
  Bottom Layer w8: 970.93,1239.52 cw(c899.3,1242.7) v1(950,1192) ccw(c899.3,1242.7) 971,1242.7 971,1264 cw(c1014.46,1264) 983.73,1294.73 1009.66,1320.66 ccw(c980.31,1350) 1021.81,1350 1022,1350.19 v1(1022,1689)
  Bottom Layer w10: U6.67@2741,1015.65 v1(2811,1015.65)
#U_CLK: C35.1 P7.1 U6.16 U8.6 | length 637.9
  Top Layer w25: U8.6@1414.39,635 C35.1@1487.5,635 1487.5,590.5 v1(1487,590)
  Bottom Layer w25: v1(1487,590) 1627.58,590 ccw(c1627.58,690) 1698.29,619.29 v1(1779,700) cw(c1761.44,682.44) 1786.28,682.44 U6.16@1786.28,515.65
#U_DATA: C33.1 P6.1 R20.2 U6.15 U8.3 | length 1812.3
  Top Layer w25: U8.3@1213.61,635 v1(1180.59,635) 1139.5,635 1139.5,574.6 ccw(c1175.35,574.6) 1150,549.26 ccw(c1172.34,571.6) 1172.34,540 1443.12,540 cw(c1443.12,440) 1505.83,517.89 cw(c1443.12,440) 1513.83,510.71 1594.95,429.59 ccw(c1635,469.65) 1635,413 1870.8,413 ; P6.1@1779,970 1842.58,970 cw(c1842.58,870) 1913.29,940.71 1916.71,937.29 cw(c1846,866.58) 1946,866.58 1946,468.63 cw(c1891.37,468.63) 1930,430 cw(c1888.96,471.04) 1888.96,413 1870.8,413 ; v1(1837.48,446.32) 1870.8,413
  Bottom Layer w25: v1(1180.59,635) R20.2@1214.5,635 ; v1(1837.48,446.32) U6.15@1837.46,515.65
#U_GND: C32.2 P4.1 U6.10 U8.1 | length 1660.1
  Top Layer w25: U8.1@1213.61,735 1213.61,742.55 cw(c1235.44,742.55) 1220,757.98 cw(c1246.59,731.39) 1246.59,769 v1(1370,769) 1370,801 cw(c1425.53,801) 1386.26,840.26 1466.71,920.71 cw(c1537.42,850) 1537.42,950 1553.58,950 ccw(c1553.58,1050) 1624.29,979.29 1688,1043 cw(c1729.04,1001.96) 1729.04,1060 P4.1@1779,1060 1851.58,1060 cw(c1851.58,960) 1922.29,1030.71 1976.71,976.29 cw(c1906,905.58) 2006,905.58 2006,486.56 ccw(c2043.56,486.56) 2017,460 ccw(c2050.03,493.03) 2050.03,446.32 v1(2093.39,446.32)
  Bottom Layer w25: C32.2@1370,737.5 v1(1370,769) ; v1(2093.39,446.32) U6.10@2093.39,513.88
#U_RST: C34.1 P5.1 U6.17 U8.7 | length 949.7
  Top Layer w25: U8.7@1414.39,685 C34.1@1487.5,685 1487.5,749.65 cw(c1523.35,749.65) 1498,775 cw(c1534.21,738.79) 1534.21,790 P5.1@1779,790 cw(c1779,712.75) 1833.63,767.37 cw(c1794.1,727.85) 1850,727.85 1850,602.62 cw(c1750,602.62) 1820.71,531.91 v1(1735.12,446.32)
  Bottom Layer w25: v1(1735.12,446.32) U6.17@1735.09,515.65
#U_VDD: C32.1 P8.1 R20.1 U6.14 U8.8 | length 1398.5
  Top Layer w25: U8.8@1414.39,735 v1(1414.39,779) 1490.1,854.71 cw(c1560.82,784) 1560.82,884 P8.1@1765,884 ; P8.1@1779,880 1800.49,880 cw(c1800.49,808.3) 1839.8,868.27 1859.71,848.35 cw(c1789,777.64) 1864.72,842.96 cw(c1789,777.64) 1889,777.64 v1(1889,445.66)
  Bottom Layer w25: R20.1@1251.5,635 1251.5,635.08 ccw(c1151.5,635.08) 1222.21,705.79 cw(c1256.52,740.1) 1208,740.1 1208,756 cw(c1259.65,756) 1223.13,792.52 1227.57,796.96 cw(c1281,731.5) 1281,816 1381.27,816 cw(c1381.27,785.27) 1403,807 cw(c1375.49,779.49) 1414.39,779.49 v1(1414.39,779) ; U6.14@1888.64,515.65 1888.64,446.02 v1(1889,445.66)
#X1_: C16.2 U5.1 X1.1 | length 203.1
  Top Layer w10: U5.1@1322,1429 1322,1465 1343.53,1486.53 X1.1@1343.53,1534 1397.35,1534 v1(1399,1535.65)
  Bottom Layer w12: C16.2@1366,1535.65 v1(1399,1535.65)
#X2_: C17.2 U5.2 X1.2 | length 219.3
  Top Layer w10: v1(1236,1511) 1236,1514.99 cw(c1260.79,1514.99) 1243.26,1532.52 cw(c1246.83,1528.95) 1246.83,1534 X1.2@1284.47,1534 1284.47,1487.53 1302.32,1469.69 U5.2@1302.32,1429
  Bottom Layer w10: v1(1236,1511) cw(c1262.56,1511) 1243.78,1529.78 1245,1531 cw(c1256.22,1519.78) 1256.22,1535.65 C17.2@1263.01,1535.65
\S\D\: P1.1 RR1.1 U1.6 | length 662.8
  Top Layer w10: 501.8,1096.2 513,1085 v1(513,1015)
  Bottom Layer w10: P1.1@69.62,1048.5 cw(c69.62,1053.62) P1.1@66,1050 ccw(c145.67,1050) 89.33,993.67 90,993 ccw(c135.87,1038.87) 135.87,974 367.9,974 ccw(c367.9,1067.32) 433.89,1001.33 cw(c466.88,968.34) 466.88,1015 v1(513,1015)
  Bottom Layer w20: P1.1@69.62,1048.5 RR1.1@140,1048.5
ANT_M: J1.1 U6.49 | length 239.1
  Top Layer w25: v1(2420,1688) J1.1@2420,1851
  Bottom Layer w25: v1(2420,1688) 2420.13,1688.13 U6.49@2420.13,1755.81 U6.49@2420.13,1764
B_IN1: U5.24 U10.3 | length 437.1
  Top Layer w8: U5.24@1048.38,1155.38 v1(1101,1155.38)
  Top Layer w12: v1(977,935) 1051.13,935 ccw(c1051.13,999.87) v1@1097,954
  Bottom Layer w8: v1@1096,954 ccw(c1093.59,956.41) v1@1097,956.41
  Bottom Layer w12: U10.3@927,954 928.72,954 cw(c928.72,885.72) v1@977,934 ; v1(1101,954) v1(1101,1155.38)
B_IN2: U5.27 U10.2 | length 433.5
  Top Layer w8: v1(1133.69,1152.31) cw(c1106.78,1125.4) 1144.83,1125.4 U5.27@1144.83,1098.29
  Top Layer w12: v1(977,985) 1114.38,985 ccw(c1114.38,1012.31) v1(1133.69,993)
  Bottom Layer w12: U10.2@927,1004 928.72,1004 cw(c928.72,935.72) v1@977,984 ; v1@1133.69,990 v1(1133.69,993) v1(1133.69,1152.31)
BOOT: CF7.2 DF1.1 L2.1 UF5.8 | length 557.7
  Top Layer w20: DF1.1@72,849.74 72,890.03 cw(c112.97,890.03) 84,919 cw(c122.63,880.37) 122.63,935 v1(142,935) CF7.2@197.5,935
  Bottom Layer w25: L2.1@91.89,584 91.89,843.47 cw(c191.89,843.47) 95.41,869.78 cw(c191.89,843.47) 121.18,914.18 v1(142,935)
CC_: RF2.2 UF1.7 | length 214.6
  Top Layer w20: RF2.2@854.5,3 854.5,121.14 cw(c908.04,121.14) 870.18,159 cw(c882.25,146.93) 882.25,164 UF1.7@923.3,164
CHG: LED2.1 UF1.5 | length 979.5
  Top Layer w12: UF1.5@923.3,64 929.58,64 cw(c929.58,-36) 974.82,53.18 cw(c929.58,-36) 1000.29,34.71 1006,29 cw(c969.79,-7.21) 1021,-7.21 v1(1021,-16) ; v1(1123,10) 1442.34,10 ccw(c1442.34,94.37) 1454.45,10.87 ccw(c1454.45,74.66) 1499.56,29.56 1660.71,190.71 cw(c1731.42,120) 1731.42,220 LED2.1@1772,220
  Bottom Layer w12: v1(1021,-16) cw(c1083.77,-78.77) 1083.77,10 v1(1123,10)
CHG_IN: C6.1 J11.1 RF1.2 RF3.2 UF1.3 UF1.8 | length 761.1
  Top Layer w20: UF1.3@710.7,114 767.37,114 867.37,214 UF1.8@923.3,214 v1(923.3,247)
  Top Layer w25: J11.1@552,158 552,100.73 ccw(c582.73,100.73) 561,79 ccw(c588.76,106.76) 588.76,67.5 RF3.2@629,67.5 629,76.66 cw(c661.63,76.66) 638.56,99.74 cw(c672.99,65.3) 672.99,114 UF1.3@710.7,114
  Bottom Layer w20: RF1.2@900,297 ccw(c964.46,297) 918.88,251.42 v1(923.3,247)
  Bottom Layer w25: J11.1@552,158 552,97.73 ccw(c582.73,97.73) 561,76 ccw(c581.52,96.52) 581.52,67.5 C6.1@628.34,67.5
COIN_VBAT: J6.1 P13.1 U11.8 | length 1188.4
  Top Layer w25: P13.1@256,1684 256,1834.58 cw(c356,1834.58) 285.29,1905.29 v1(317,1937)
  Bottom Layer w25: v1(317,1937) 317,1818.42 ccw(c417,1818.42) 346.29,1747.71 646.08,1447.92 cw(c593.16,1395) 668,1395 668,1386.42 ccw(c768,1386.42) 697.29,1315.71 700,1313 cw(c661.37,1274.37) 716,1274.37 U11.8@716,1173.7
D+: J3.3 RF23.2 RF24.2 | length 148.5
  Top Layer w12: J3.3@207,1407.57 246.34,1407.57 265,1388.91 v1(265,1374) RF24.2@298.5,1374
  Bottom Layer w12: v1(265,1374) 296.5,1374 RF23.2@298.5,1376
D-: J3.2 RF21.2 RF22.2 | length 130.6
  Top Layer w12: J3.2@207,1433.17 255.83,1433.17 v1(265,1424) RF21.2@298.5,1424 RF21.2@297.5,1425
  Bottom Layer w12: v1(265,1424) 297.5,1424 RF22.2@298.5,1423
EN_: Q7.3 RB1.1 SB9.2 SB10.1 | length 1448
  Top Layer w12: v1(365,363) v1(516,363) ; RB1.1@947.5,585 v1(947.5,511) 947.5,432.92 ccw(c1047.5,432.92) 976.79,362.21 v1(1002,337)
  Top Layer w15: v1(110,180) v1(110,363)
  Bottom Layer w12: SB9.2@55,120 SB10.1@55,170 ; v1(110,363) v1(365,363) ; v1(516,363) 516.71,363.71 cw(c587.42,293) 567.52,391 ; 567,391 567.52,391 ; v1(947.5,511) 948.01,511.51 Q7.3@948.01,544.32 ; v1(1002,337) 1000.29,338.71 ccw(c929.58,268) 929.58,368 660.8,368 cw(c660.8,415.8) 627,382 ccw(c605.27,360.27) 605.27,391 567.52,391
FB#: CF17.1 RF16.2 RF31.2 UF2.3 | length 151.1
  Bottom Layer w20: UF2.3@114,131 114,79.21 ccw(c115.71,79.21) RF16.2@114.5,78 CF17.1@114.5,29 RF31.2@114.5,-20
FB_: R21.2 R22.2 U9.3 | length 133.1
  Top Layer w20: R22.2@698,607.5 767.72,607.5 U9.3@767.82,607.6 767.82,560.92 ccw(c788.92,560.92) R21.2@774,546
GND: C1.2 C2.2 C3.2 C4.2 C5.1 C6.2 C9.2 C10.2 C11.2 C12.2 C13.2 C14.2 C15.2 C16.1 C17.1 C18.2 C19.2 C20.2 C21.2 C22.2 C23.2 C24.2 C25.2 C26.2 C27.1 C29.2 C30.2 C31.2 C33.2 C34.2 C35.2 C36.2 C37.2 C38.1 C39.2 C40.2 CF1.2 CF2.2 CF3.2 CF6.1 CX1.1 CX2.1 D2.1 DF1.2 J1.2 J1.3 J3.5 J4.3 J4.5 J4.9 J5.3 J5.5 J6.2 J7.3 J11.2 J11.3 LED1.2 P1.2 P12.1 P17.2 pad.NC@2090.05,1894 Q4.2 Q5.2 Q6.2 Q7.2 QF3.2 QF4.2 QF7.2 R2.1 R5.2 R8.2 R16.2 R17.2 R19.2 R22.1 R26.2 R28.2 RF4.2 RF6.1 RF8.2 RF11.2 RF14.2 RF16.1 RP2.2 RP4.2 SW1.2 U1.4 U3.3 U4.4 U5.5 U5.18 U5.35 U5.42 U6.8 U6.9 U6.19 U6.22 U6.36 U6.46 U6.48 U6.50 U6.51 U6.52 U6.53 U6.54 U6.56 U6.72 U6.85 U6.86 U6.87 U6.88 U6.89 U6.90 U6.91 U6.92 U6.93 U6.94 U6.95 U6.96 U6.97 U6.98 U6.99 U6.100 U6.101 U6.102 U6.103 U6.104 U6.105 U6.106 U6.107 U6.108 U6.109 U6.110 U6.111 U6.112 U9.2 U10.1 U10.7 U10.9 U11.4 UF1.6 UF2.2 UF5.6 UF5.9 | length 20287.6
  Top Layer w10: U5.18@1048.38,1273.49 1076.1,1273.49 cw(c1076.1,1252.39) 1091,1267.33 ; 1091.02,1267.31 1095.82,1262.51 ; U5.5@1243.26,1429 v1(1243.26,1477.26) ; v1(1302.32,1048) U5.35@1302.32,1098.29 ; U5.42@1379.09,1253.8 v1@1426.8,1253.8
  Top Layer w12: v1(1725,2093) 1729.28,2097.28 cw(c1777,2049.56) 1777,2117.05
  Top Layer w20: DF1.2@72,692.26 83.51,692.26 cw(c83.51,592.26) 154.22,662.97 157.7,659.49 ccw(c178.21,680) 178.21,651 CF3.2@228.23,651 ; v1(125,1356) 125.39,1356.39 J3.5@207,1356.39 236.61,1356.39 253.11,1339.89 ccw(c301.12,1387.89) 301.12,1320 P12.1@449,1320 496.13,1320 cw(c496.13,1255.13) 542,1301 560.37,1282.63 ccw(c615,1337.25) 615,1260 649.58,1260 ccw(c649.58,1360) 720.29,1289.29 v1(742,1311) 759.64,1328.64 ccw(c745.48,1342.79) CX2.1@765.5,1342.79 765.29,1343 CX1.1@705,1343 ; v1(146,764) 146,708.83 ccw(c152.83,708.83) 148,704 ; R2.1@159,1082.5 159,1115.93 cw(c176.07,1115.93) 164,1128 ; v1(162,1253) 356.06,1253 cw(c356.06,1171.06) 414,1229 cw(c353.64,1168.64) 439,1168.64 v1(439,1143) 439,1015.21 ccw(c440.71,1015.21) C5.1@439.5,1014 439.5,990.52 cw(c410.48,990.52) 431,970 426.89,965.89 cw(c366.8,1025.98) 366.8,941 ccw(c366.8,893.2) 333,927 v1@312.41,906.41 ; C3.2@226.5,1055 226.5,1119 ; v1@309,905 ccw(c309,909.83) 310.8,905.35 cw(c246.58,982) 246.58,882 245.81,882 245.81,822.19 CF2.2@246,822 264.69,822 ccw(c264.69,849.31) 284,830 cw(c308.78,805.22) 308.78,840.26 RF6.1@408.5,840.26 408.5,872.48 cw(c437.52,872.48) 417,893 cw(c446.81,863.19) 446.81,905.35 502,905.35 cw(c502,831.35) 554.33,883.67 ; U1.4@312.54,1070.61 338.34,1070.61 ccw(c338.34,1102.66) 361,1080 ccw(c350.64,1090.36) 365.29,1090.36 v1(365.29,1138) ; 554.33,883.68 599,839 ccw(c618.31,858.31) 618.31,831 637.84,831 ; R22.1@698,644.5 v1(698,676) ; R22.1@698.5,645 U9.2@767.82,645 ; C38.1@888,1025 888,1003.86 ccw(c988,1003.86) 917.29,933.15 930.37,920.07 ccw(c974,963.71) 974,902 v1(1101,902) 1117.58,902 ccw(c1117.58,1002) 1188.29,931.29 v1(1251,994) ; C36.2@955.5,694 955.5,740.08 cw(c1055.5,740.08) 984.79,810.79 v1(991,817) ; 1095.82,1262.51 cw(c1083.31,1250) 1101,1250 v1(1101,1217) 1158,1217 v1(1191,1184) ; v1(1100,711.5) 1100.5,711 C33.2@1100.5,635 v1(1100.5,556.5) ; RP4.2@1220.5,1558 1220.5,1569.06 cw(c1252.93,1569.06) 1230,1592 cw(c1239.66,1582.34) 1239.66,1596 v1(1338,1596) ; v1(1375.5,1423) cw(c1458.79,1423) 1399.87,1481.87 ; RF14.2@1399,1020.5 ccw(c1439.79,1061.29) 1439.79,1003.6 QF7.2@1453.68,1003.6 v1(1488,1003.6) ; 1399.9,1481.9 1403.5,1485.5 cw(c1460.23,1428.77) 1460.23,1509 1753.89,1509 ccw(c1753.89,1584.11) v1(1807,1531) ; 1574,37 1633.15,96.15 ccw(c1597.3,132) v1(1648,132) ; LED1.2@1809.7,167 1896.58,167 cw(c1896.58,67) 1967.29,137.71 v1(1981,124) v1(1981,319) ; 1989.51,1958.49 ccw(c2043.82,2012.82) 2043.82,1936 2182.96,1936 ; J4.9@2234,2040.46 2234,1977.14 cw(c2199.86,1977.14) 2224,1953 cw(c2182.96,1994.04) 2190.49,1936.49 ; v1(2268,598) 2307.62,598 cw(c2307.62,553.62) 2339,585 cw(c2324.51,570.51) 2345,570.51 2345,495 ; v1@2852,1130 D2.1@2852,1375.79 2876.34,1375.79 ccw(c2876.34,1410.66) 2901,1386 ccw(c2872.03,1414.97) 2913,1414.97 v1(2913,1510.35) ; 2182.96,1936 ccw(c2182.96,1994.04) 2190.49,1936.49 ; 2182.96,1936 2190,1936 2190.49,1936.49
  Top Layer w25: 153,393 v1(153,177) ccw(c198.87,222.87) 198.87,158 J11.2@323.65,158 ; 153,396.58 cw(c253,396.58) 182.29,467.29 198.94,483.94 ccw(c128.23,554.65) 228.23,554.65 CF3.2@228.23,651 ; J11.2@323.68,227.32 cw(c389.71,229.29) J11.2@323.65,229.29 ; v1(675,259.62) ccw(c630.62,259.62) 662,291 ccw(c642.69,271.69) 642.69,299 398.53,299 ccw(c398.53,220.47) 343,276 ccw(c389.71,229.29) J11.2@323.65,229.29 ; J7.3@687.15,2256 771.86,2340.71 cw(c842.57,2270) 842.57,2370 1059.58,2370 cw(c1059.58,2270) 1130.29,2340.71 1153.01,2317.99 cw(c1109.4,2274.39) 1171.07,2274.39 SW1.2@1171.07,1937 ; RF4.2@747.5,3 747.5,-5.89 cw(c721.89,-5.89) 740,-24 737.08,-26.92 cw(c727.29,-17.13) 727.29,-30.98 J11.3@433.89,-30.98 412.4,-30.98 cw(c412.4,69.02) 341.69,-1.69 337,3 cw(c369.22,35.22) 323.65,35.22 J11.2@323.65,158 ; UF1.6@923.3,114 952.69,114 cw(c952.69,86.69) 971.99,106.01 1073.71,4.29 ccw(c1144.42,75) 1144.42,-25 1504,-25 ccw(c1504,-5.69) 1517.66,-19.34 1574,37 ; U3.3@1284,199.32 U3.3@1283.68,198.99 ccw(c1377.04,198.99) 1311.02,132.98 1316,128 cw(c1277.37,89.37) 1332,89.37 v1(1332,67) ; v1(1545.41,744) 1545.41,685.42 ccw(c1547.42,685.42) 1546,684 ; 1777,2117.05 1867.22,2117.05 cw(c1867.22,2040.44) 1921.39,2094.61 1936.42,2079.58 cw(c1869.85,2013) 1964,2013 ccw(c2034.01,2013) 1984.49,1963.51 1989.5,1958.5 ; 2090.05,1934.2 pad.NC@2090.05,1894 2090.05,1870.43 ccw(c2190.05,1870.43) 2119.34,1799.72 ccw(c2180.74,1861.12) 2180.74,1774.29 J1.2@2361.93,1774.29 2361.93,1684.07 v1(2362,1684) ; v1(2150,592) 2150,629.58 cw(c2250,629.58) 2179.29,700.29 2184,705 cw(c2254.01,634.99) 2254.01,734 v1(2444,734) ; 2478.07,1593.83 cw(c2464.17,1593.83) 2474,1584 cw(c2457.1,1567.1) 2481,1567.1 ; v1(2478.07,1686) J1.3@2478.07,1774.29 ; v1(2664,759.75) 2799.01,759.75 ccw(c2799.01,790.99) 2821.1,768.9 2821.71,769.51 ccw(c2751,840.22) 2851,840.22 v1(2851,876) ; J11.2@323.65,158 J11.2@323.65,229.29
  Bottom Layer w20: v1(146,764) 146,797.03 cw(c186.97,797.03) 158,826 cw(c172.49,811.51) 172.49,832 UF5.6@215.81,832 ; RF16.1@151.5,78 ccw(c146.99,82.51) 153.37,82.51 UF2.2@153.37,131 ; 710.81,647.34 ccw(c733.42,684.51) 711.35,647.01 ; v1(742,1311) 804.93,1311 ccw(c804.93,1371.55) 847.75,1328.73 ccw(c803.69,1372.79) 854.58,1336.83 ccw(c803.69,1372.79) 866,1372.79 U11.4@866,1394.3 ; C37.2@758,553 758,496.14 ccw(c792.14,496.14) 768,472 ccw(c790.51,494.51) 790.51,462.68 Q7.2@910.6,462.68 ; C40.2@758,641 733.42,641 ; 766.5,869 740.38,869 ccw(c740.38,824.62) 709,856 ccw(c735.56,829.44) 698,829.44 v1(698,800) v1(698,676) ccw(c736.27,676) 709.21,648.94 ccw(c728.37,668.1) 711.35,647.01 ; C37.2@769,553 C37.2@769,563 ; 804,1045 cw(c825.73,1023.27) 823.33,1053.91 cw(c825.73,1023.27) 825.73,1054 U10.1@927,1054 963.6,1054 cw(c963.6,1017.15) 989.66,1043.21 cw(c947.78,1001.33) 1007,1001.33 v1(1007,901.66) 1007,855.63 cw(c952.37,855.63) v1(991,817) ; U10.9@816.81,979 U10.9@816.81,1018.39 ; v1(1100,711.5) ccw(c1097.59,713.91) 1101,713.91 v1(1101,902) ; v1@1100,1216 v1(1101,1217) ; v1(1100.5,556.5) 1178.14,478.86 ccw(c1238.16,538.89) 1238.16,454 1438,454 cw(c1438,359.85) 1504.58,426.42 1582.71,348.29 ccw(c1653.42,419) 1653.42,319 v1(1981,319) ; v1@1102.5,1215.5 v1(1101,1217) ; Q5.2@1157.4,1416.69 1157.4,1441.6 1142.5,1456.5 R17.2@1142.5,1470 1203,1470 1210.26,1477.26 v1(1243.26,1477.26) 1288.99,1522.99 C17.1@1288.99,1535.65 C16.1@1340.02,1535.65 1340.02,1458.48 v1(1375.5,1423) ; v1(1191,1184) 1257.06,1117.94 ; v1@1243.28,1477.24 cw(c1201.64,1435.64) 1260.5,1435.64 C11.2@1260.5,1416 1260.5,1354.62 cw(c1204.42,1354.62) 1244.08,1314.97 ; 1244.07,1314.96 1162.06,1232.95 cw(c1123.56,1271.46) 1123.56,1217 v1(1101,1217) ; R19.2@1249.5,905.5 1249.5,922.5 1270.76,943.76 1302.32,943.76 1302.32,1003.6 ; v1(1251,994) cw(c1274.19,970.81) 1274.19,1003.6 1302.32,1003.6 ; 1257.08,1117.92 ccw(c1304.5,1165.39) C14.2@1304.5,1098.29 ; v1(1302.32,1048) 1302.32,1003.6 ; v1@1368.5,1416 v1(1375.5,1423) ; v1(1427,1255) 1379.5,1255 C15.2@1375.5,1251 C13.2@1375.5,1300 R28.2@1375.5,1366 v1(1375.5,1423) ; v1(1488,1003.6) 1302.32,1003.6 ; C29.2@1593.62,2093 v1@1624,2093 ; v1@1624,2094 v1(1625,2093) v1(1725,2093) ; v1(1648,132) 1710.19,194.19 cw(c1772.5,131.88) R5.2@1772.5,220 ; U6.89@1802.02,1458.57 1802.02,1518.99 cw(c1819.01,1518.99) v1(1807,1531) ; 2201,598 v1(2268,598) ; 2268,781.59 cw(c2271.41,781.59) 2269,784 ; v1(2444,734) 2444,779 ; U6.108@2557.93,812.9 2597.42,773.41 ; v1(2581,604) 2581,719 ; v1(2851,876) v1(2851,1130) ; C25.2@2877.5,1372.35 C24.2@2877.5,1424.32 C20.2@2877.5,1475.82 2877.5,1511.25 ; 2877.5,1512.22 2877.5,1511.25 ; v1(2913,1510.35) 2912.1,1511.25 2877.5,1511.25 ; 711.35,647.01 ccw(c733.42,684.51) 733.42,641 ; 711.35,647.01 ccw(c728.37,668.1) 728.37,641 733.42,641
  Bottom Layer w25: P1.2@66,1150 103.27,1150 ccw(c103.27,1180.73) 125,1159 132.71,1166.71 ccw(c62,1237.42) 162,1237.42 v1(162,1253) C30.2@162,1387.5 ; v1(153,177) 153.37,176.63 UF2.2@153.37,131 ; UF5.6@215.81,832 UF5.9@301,832 ; J11.3@433.89,-30.98 584.84,-30.98 ccw(c584.84,20.16) 621,-16 ccw(c603.27,1.73) 628.34,1.73 C6.2@628.34,30.5 ; 674,184.79 ccw(c671.59,187.21) 675,187.21 v1(675,259.62) ; U10.7@700.62,1004 791.81,1004 U10.9@816.81,979 ; U10.9@791.81,972 U10.9@816.81,947 ; J6.2@946.96,1848 1047.58,1848 ; RP2.2@1135.5,85 1135.5,66.59 ccw(c1181.59,66.59) 1149,34 1178.71,4.29 ccw(c1249.42,75) 1249.42,-25 1384.63,-25 ; 1202,1826 1291.16,1826 cw(c1291.16,1781.62) 1322.54,1813 cw(c1284.01,1774.47) 1338.5,1774.47 C16.1@1338.5,1539.31 ; U4.4@1236.7,236.5 v1(1289,236.5) ; v1(1332,67) 1332,24.8 ccw(c1379.8,24.8) 1346,-9 ccw(c1384.63,29.63) 1384.63,-25 ; P17.2@1504,-25 1384.63,-25 ; v1(1545.41,744) cw(c1583.43,705.98) 1583.43,759.75 U6.19@1618.95,759.75 1805,759.75 ; R8.2@1552.5,132 v1(1648,132) ccw(c1667.31,151.31) 1667.31,124 v1(1981,124) ; U6.22@1618.95,913.29 1740.24,913.29 ccw(c1740.24,1000.66) U6.107@1802.02,938.88 ; U6.36@1618.95,1629.83 1772,1629.83 cw(c1772,1627) 1774,1629 ; U6.112@1778.16,789.04 U6.112@1802.02,812.9 ; 1784.91,1614.08 cw(c1784.91,1589.91) 1802,1607 ; 1853.48,897.54 ccw(c1853.48,902.52) 1857,899 ; pad.NC@2090.05,1894 2107.42,1876.63 cw(c2017.79,1787) 2144.54,1787 U6.46@2144.54,1755.81 ; U6.9@2144.54,515.65 U6.8@2195.72,515.65 ; U6.86@2368.95,1458.57 ccw(c2342.28,1485.24) 2380,1485.24 v1(2380,1548) ; U6.48@2368.95,1755.81 2368.95,1700.78 cw(c2345.22,1700.78) v1(2362,1684) 2362,1591.46 ccw(c2423.46,1591.46) v1(2380,1548) ; 2415.97,1562.9 ccw(c2415.97,1512.03) v1(2380,1548) ; 2588,1581 ccw(c2593.68,1586.68) 2593.68,1578.65 U6.56@2741,1578.65 ; 2600,758 2601.75,759.75 v1(2664,759.75) U6.72@2741,759.75
  other v1: 309,904 1131,1841
GSM_D+: RF24.1 U6.69 | length 3104.4
  Top Layer w10: RF24.1@335.5,1374 437.58,1374 ccw(c437.58,1474) 508.29,1403.29 695.32,1590.32 cw(c738,1547.64) 738,1608 v1(876,1608) ; v1(876,1657) 967.93,1657 cw(c967.93,1639.93) 980,1652 ccw(c1004.6,1676.6) 1004.6,1641.81 1778.77,1641.81 cw(c1778.77,1541.81) 1849.48,1612.52 2042,1420 ; 2042.03,1419.97 cw(c2000.96,1378.96) 2059,1378.96 2059,1355
  Top Layer w12: 2059,1355 2059,1223.42 ccw(c2159,1223.42) 2088.29,1152.71 2298.42,942.58 ccw(c2369.13,1013.29) 2369.13,913.29 v1(2811,913.29)
  Bottom Layer w10: v1(876,1608) v1(876,1657) ; U6.69@2741,913.29 v1(2811,913.29)
GSM_D-: RF21.1 U6.70 | length 3062.5
  Top Layer w10: RF21.1@335.5,1424 466.72,1424 ccw(c466.72,1516.33) 532,1451.04 689.59,1608.64 cw(c746,1552.23) 746,1632 962.1,1632 cw(c962.1,1608.1) 979,1625 ccw(c988.66,1634.66) 988.66,1621 1747.58,1621 cw(c1747.58,1521) 1818.29,1591.71 2007.5,1402.5 cw(c1958.01,1353.01) 2028,1353.01
  Top Layer w12: 2028,1353 2028,1189.71 ccw(c2128,1189.71) 2057.29,1119 2284.89,891.4 ccw(c2355.6,962.11) 2355.6,862.11 v1(2811,862.11)
  Bottom Layer w10: U6.70@2741,862.11 v1(2811,862.11)
IN1-: RP1.1 RP2.1 U4.2 | length 115.7
  Bottom Layer w12: RP2.1@1172.5,85 RP1.1@1172.5,136.5 U4.2@1236.7,136.5
IN2-: R6.1 R8.1 U4.6 | length 117.3
  Bottom Layer w20: U4.6@1449.3,186.5 1514.29,186.5 cw(c1514.29,184.79) 1515.5,186 R8.1@1515.5,135
IN+: R7.1 U3.1 U3.2 U4.3 U4.5 | length 334.4
  Top Layer w20: U3.1@1368.32,161.59 U3.2@1368.32,236.4 v1(1401,236.4)
  Bottom Layer w20: U4.3@1236.7,186.5 1287.99,186.5 ccw(c1287.99,236.01) 1323,201 1329.11,207.11 cw(c1399.82,136.4) 1399.82,236.4 v1(1401,236.4) 1449.19,236.4 U4.5@1449.3,236.5
MCU_D+: RF23.1 U5.34 | length 1308
  Top Layer w8: 1080,1425.34 ccw(c1136.36,1425.34) 1096.51,1385.49 1132.02,1349.98 cw(c1086.34,1304.29) 1150.95,1304.29 1150.95,1297.39 ccw(c1198.92,1297.39) 1164.97,1263.5 ; 1165,1263.47 1274.26,1154.22 cw(c1254.04,1134) 1282.63,1134 U5.34@1282.63,1098.29